# Altium PCB BUCK-BOOST_PWM_Controller.PcbDoc (part 2 of 2)
Units mm, origin at the board's own origin, x right, y up, seen from the top; angles counter-clockwise.
Board outline 90.1 x 70.25 mm, 2 copper layers (Top Layer, Bottom Layer); 191 components, 99 nets, 467 pads, 92 vias.
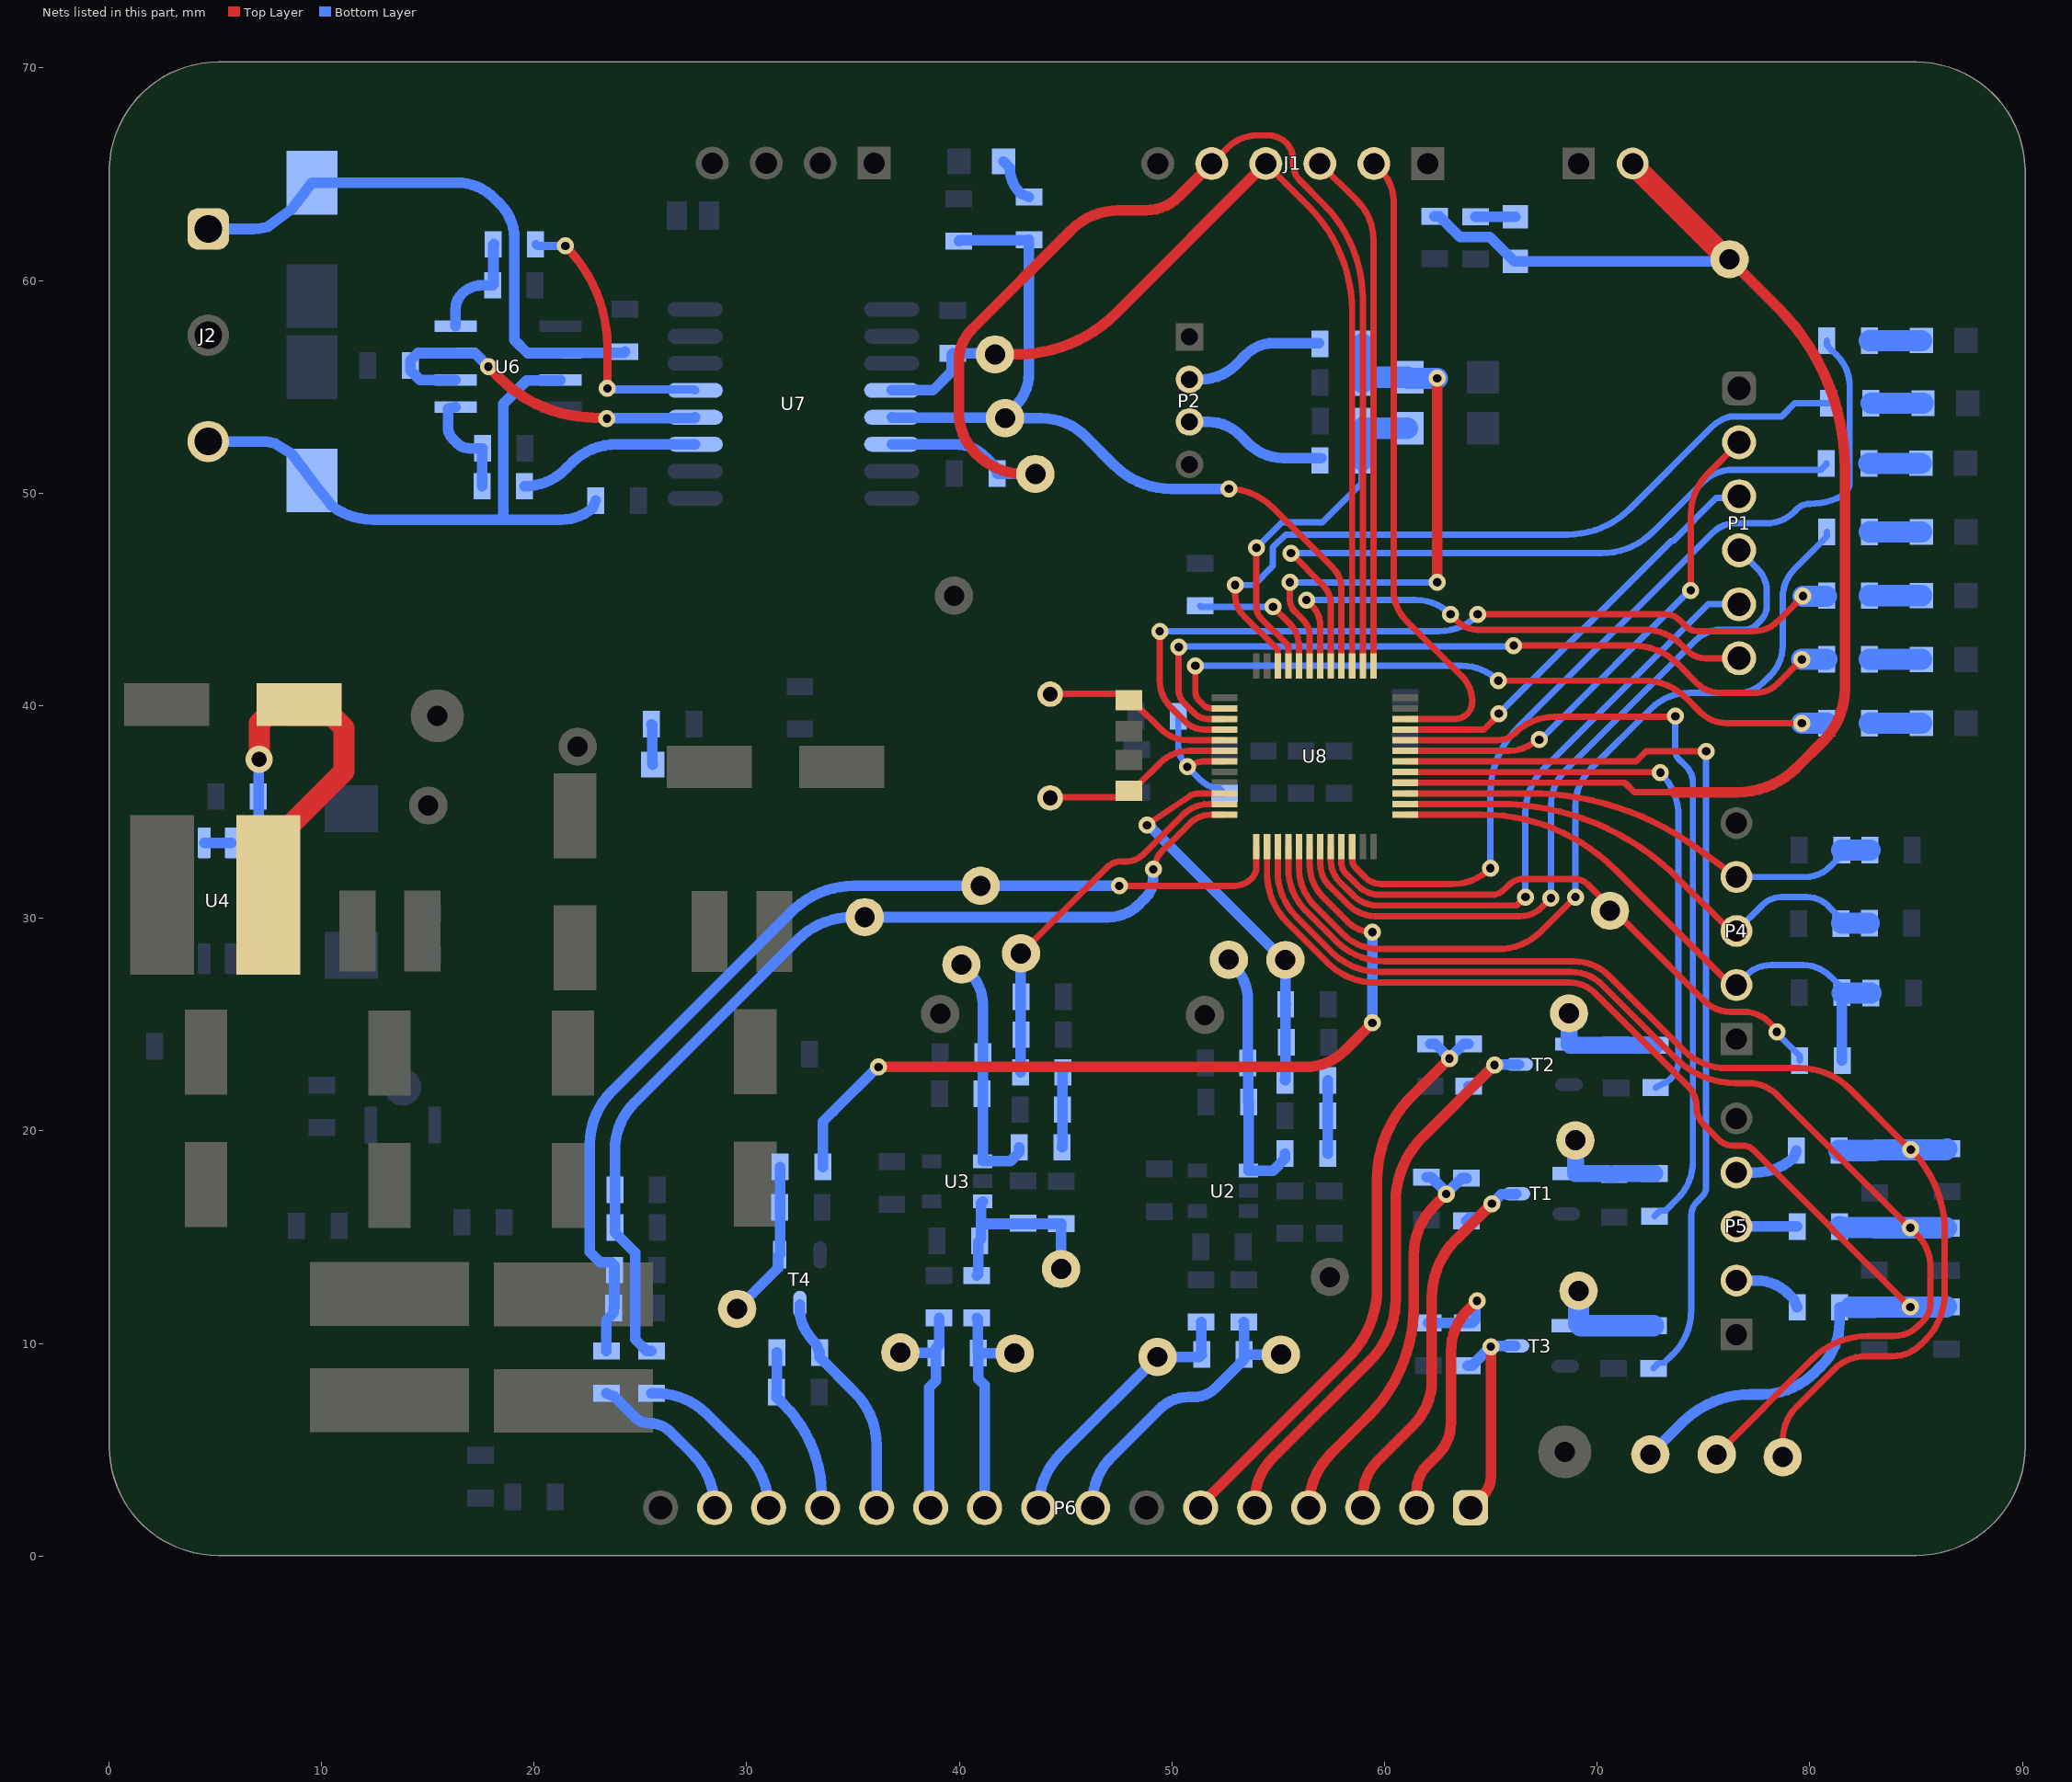
[diagram p2: the nets of this part, all layers, seen from the top]

## Via types
v1: diameter 0.8/0.8 (per signal layer), hole 0.4, Top Layer to Bottom Layer, tented both sides, 84 vias
v2: diameter 1.27, hole 0.711, Top Layer to Bottom Layer, 8 vias

## Nets (pads, with @x,y where several pads share a name; then routed paths per layer and width w, separated by ;. In a path a pad name is that pad's centre, name@x,y a point inside that pad or via, vN(x,y) a via of type N, cw(c..) or ccw(c..) an arc to the next point about the centre after c; other vN are vias at no path point) (continued)
NetC8_2: C8.2 C17.2 R4.2 R15.2 TP5.1 U3.3 | length 9.8
  Bottom Layer w0.5: R4.2@40.825,13.2 40.887,13.262 40.887,14.762 C8.2@40.95,14.825 41.025,14.9 41.025,15.587 ; U3.3@41.1,16.675 41.025,16.6 41.025,15.587 ; TP5.1@44.787,13.225 TP5.1@44.787,13.5 44.787,15.613 R15.2@44.8,15.625 41.063,15.625 41.025,15.587
NetC10_1: C10.1 P6.9 R9.1 TP10.1 | length 12.9
  Bottom Layer w0.5: P6.9@43.73,2.27 cw(c47.351,2.27) 44.792,4.832 TP10.1@49.322,9.362 51.288,9.362 C10.1@51.4,9.475 51.388,9.487 51.388,10.988 R9.1@51.375,11
NetC10_2: C10.2 P6.8 R3.1 TP2.1 | length 14.1
  Bottom Layer w0.5: P6.8@46.27,2.27 46.27,2.514 cw(c49.303,2.514) 47.16,4.66 49.411,6.911 cw(c50.77,5.556) 50.77,7.475 51.009,7.475 51.011,7.475 ccw(c51.011,8.957) 52.061,7.911 53.25,9.1 53.4,9.25 C10.2@53.4,9.475 TP2.1@55.125,9.475 ; R3.1@53.375,11 53.388,10.987 C10.2@53.388,9.475
NetC11_1: C11.1 P6.11 R10.1 TP12.1 | length 10.8
  Bottom Layer w0.5: TP12.1@37.225,9.575 37.238,9.562 38.887,9.562 C11.1@38.9,9.55 ; P6.11@38.65,2.27 38.575,2.345 38.575,7.925 38.9,8.25 C11.1@38.9,9.55 ; R10.1@39.05,11.2 39.05,9.925 38.9,9.775 C11.1@38.9,9.55
NetC11_2: C11.2 P6.10 R4.1 TP4.1 | length 10.8
  Bottom Layer w0.5: R4.1@40.825,11.2 40.862,11.163 40.862,9.587 C11.2@40.9,9.55 ; P6.10@41.19,2.27 41.19,8.035 40.9,8.325 C11.2@40.9,9.55 ; TP4.1@42.6,9.525 42.588,9.537 40.912,9.537 C11.2@40.9,9.55
NetC12_2: C12.2 R5.1 R6.2 | length 3.4
  Bottom Layer w0.5: R5.1@57.325,18.925 C12.2@57.325,20.7 R6.2@57.325,22.375
NetC13_2: C13.2 R6.1 R12.1 TP6.1 U8.10 | length 18.9
  Top Layer w0.3: v1(48.825,34.375) 48.902,34.452 50.876,35.772 ; 50.876,35.772 50.903,35.79 cw(c51.332,34.753) 51.333,35.875 ; 51.334,35.875 U8.10@52.475,35.875
  Bottom Layer w0.3: v1(48.825,34.375) v1@48.913,34.375 ; TP6.1@55.25,28.038 TP6.1@55.338,28.038
  Bottom Layer w0.5: v1@48.913,34.375 TP6.1@55.25,28.038 ; R6.1@55.325,22.375 55.338,22.387 55.338,25.937 C13.2@55.35,25.95 55.338,25.962 TP6.1@55.338,28.038
NetC14_2: C14.2 R7.1 R8.2 | length 3.5
  Bottom Layer w0.5: R7.1@44.825,19.225 44.85,19.25 C14.2@44.85,21 44.85,22.725 R8.2@44.875,22.75
NetC15_2: C15.2 R8.1 R13.1 TP8.1 U8.11 | length 17.9
  Top Layer w0.3: TP8.1@42.9,28.35 46.928,32.379 cw(c47.643,31.665) 47.643,32.675 ; 47.644,32.675 47.866,32.675 ; 47.867,32.675 ccw(c47.867,33.78) 48.649,32.999 50.505,34.855 cw(c51.76,33.601) 51.76,35.375 U8.11@52.475,35.375
  Bottom Layer w0.5: R8.1@42.875,22.75 42.887,22.762 42.887,28.337 TP8.1@42.9,28.35
NetC18_2: C18.2 R5.2 R16.2 TP7.1 U2.1 | length 12.4
  Bottom Layer w0.5: TP7.1@52.675,28.05 53.002,27.671 cw(c51.214,26.129) 53.575,26.129 R16.2@53.575,23.2 53.588,23.187 53.588,21.362 C18.2@53.6,21.35 U2.1@53.6,18.125 54.75,18.125 55.325,18.7 R5.2@55.325,18.925
NetC19_2: C19.2 R7.2 R17.2 TP9.1 U3.1 | length 11.7
  Bottom Layer w0.5: TP9.1@40.1,27.817 40.498,27.419 cw(c39.044,25.965) 41.1,25.965 R17.2@41.1,23.5 41.1,21.75 U3.1@41.1,18.575 42.4,18.575 42.825,19 R7.2@42.825,19.225
NetC24_1: C24.1 C26.2 L2.2 U4.8 | length 19.7
  Top Layer w1: v2@7.075,37.548 7.075,39.175 7.95,40.05 8.45,39.55 10.464,39.55 11.05,38.964 11.05,36.9 7.5,33.35 L2.2@7.5,31.1
  Bottom Layer w0.5: U4.8@7.03,33.55 7.053,33.572 7.053,37.453 v2(7.075,37.475)
NetC39_1: C39.1 U8.5 Y1.2 | length 9.2
  Top Layer w0.3: Y1.2@44.275,40.565 48.075,40.565 48.417,40.223 48.417,39.963 49.465,38.915 49.466,38.913 ccw(c50.765,40.212) 50.767,38.375 ; 50.768,38.375 U8.5@52.475,38.375
NetC40_1: C40.1 U8.6 Y1.1 | length 9.2
  Top Layer w0.3: Y1.1@44.275,35.685 48.075,35.685 48.075,35.946 48.456,36.327 48.458,36.327 49.434,37.303 cw(c50.814,35.924) 50.814,37.875 ; 50.815,37.875 U8.6@52.475,37.875
NetC41_2: C41.2 R35.1 U8.7 | length 6.5
  Top Layer w0.3: v1(50.726,37.126) 51.113,37.299 cw(c51.457,36.531) 51.457,37.373 52.028,37.373 U8.7@52.475,37.375
  Bottom Layer w0.3: 50.3,38.155 ccw(c51.755,38.155) 50.51,37.402 ccw(c50.766,37.559) 50.531,37.372 v1(50.726,37.126) 51.375,36.477 ccw(c52.225,37.327) 52.223,36.125 R35.1@52.475,35.875 ; 50.3,38.156 C41.2@50.3,39.5
NetC42_2: C42.2 R60.2 R63.2 TP37.1 U8.13 | length 49.2
  Top Layer w0.3: v1(47.525,31.525) 52.918,31.525 ; 52.919,31.525 ccw(c52.919,32.687) 53.739,31.864 53.741,31.866 ccw(c53.176,32.431) 53.975,32.431 U8.13@53.975,33.375
  Bottom Layer w0.5: R60.2@23.4,9.649 23.4,11.099 23.75,11.449 C42.2@23.75,11.674 ; C42.2@23.775,11.699 R63.2@23.775,13.674 ; R63.2@23.775,13.449 R63.2@23.775,13.674 ; v1(47.525,31.525) TP37.1@41,31.525 35.044,31.525 ccw(c35.044,27.374) 32.108,30.308 23.644,21.844 ccw(c26.099,19.386) 22.625,19.386 22.625,19.384 22.625,14.3 23.101,13.824 23.625,13.824 R63.2@23.775,13.674
NetC43_2: C43.2 R52.2 R64.2 TP33.1 U8.12 | length 45.9
  Top Layer w0.3: v1(49.125,32.3) 49.251,32.701 cw(c50.287,32.376) 49.519,33.144 50.216,33.841 50.823,34.448 cw(c51.848,33.424) 51.848,34.873 52.028,34.873 U8.12@52.475,34.875
  Bottom Layer w0.5: R52.2@25.525,9.649 25.3,9.649 24.75,10.199 24.75,14.274 23.8,15.224 C43.2@23.8,15.449 R64.2@23.8,17.224 23.8,19.089 23.8,19.09 cw(c26.962,19.09) 24.727,21.327 32.388,28.988 cw(c34.949,26.43) TP33.1@34.949,30.05 ; TP33.1@35.55,30.05 46.337,30.05 46.339,30.05 46.999,30.05 47.001,30.05 ccw(c47.001,32.1) 48.452,30.652 48.763,30.963 ccw(c47.92,31.805) 49.112,31.805 49.112,32.287 v1(49.125,32.3)
NetC44_2: C44.2 R62.2 R67.2 TP36.1 U8.16 | length 60.3
  Top Layer w0.3: U8.16@55.475,33.375 55.475,32.928 55.475,32.332 ccw(c58.275,32.335) 56.295,30.355 56.296,30.354 57.732,28.918 57.733,28.917 ccw(c60.007,31.191) 60.007,27.975 60.009,27.975 68.91,27.975 cw(c68.91,25.646) 70.558,27.292 74.053,23.797 74.054,23.796 ccw(c76.097,25.839) 76.097,22.95 76.098,22.95 79.533,22.95 cw(c79.533,19.618) 81.889,21.974 81.89,21.972 v1(84.75,19.112) cw(c80.888,15.25) 86.35,15.25 86.35,12.384 cw(c83.191,12.384) 85.424,10.149 85.219,9.944 cw(c83.907,11.255) 83.907,9.4 ; TP36.1@78.725,4.65 78.725,5.428 cw(c81.017,5.426) 79.397,7.047 81.099,8.749 cw(c82.67,7.179) 82.67,9.4 83.906,9.4
  Bottom Layer w1: R62.2@81.375,19.075 C44.2@83.05,19.075 83.088,19.112 v1(84.75,19.112) 86.413,19.112 R67.2@86.45,19.15
NetC45_2: C45.2 R58.2 R65.2 TP35.1 U8.15 | length 59.9
  Top Layer w0.3: 54.975,32.182 ccw(c57.95,32.182) 55.844,30.081 55.848,30.077 57.514,28.411 57.515,28.41 ccw(c59.772,30.666) 59.772,27.475 59.773,27.475 68.775,27.475 cw(c68.775,25.423) 70.227,26.873 73.683,23.417 ccw(c76.499,26.23) 76.499,22.25 76.5,22.25 77.089,22.25 77.091,22.25 cw(c77.09,20.265) 78.494,21.669 78.496,21.667 v1(84.725,15.437) 85.048,15.115 cw(c83.534,13.601) 85.675,13.601 85.675,11.868 cw(c84.545,11.868) 85.343,11.068 85.088,10.813 cw(c83.971,11.928) 83.971,10.35 ; 54.975,32.183 U8.15@54.975,33.375 ; TP35.1@75.625,4.775 80.107,9.257 cw(c82.744,6.622) 82.744,10.35 83.97,10.35
  Bottom Layer w1: R58.2@81.4,15.5 81.45,15.45 C45.2@83.025,15.45 83.038,15.437 v1(84.725,15.437) 86.413,15.437 R65.2@86.425,15.425
NetC46_2: C46.2 R53.2 R66.2 TP31.1 U8.14 | length 58.3
  Top Layer w0.3: 54.475,32.116 ccw(c57.772,32.116) 55.437,29.788 55.442,29.783 57.322,27.903 57.323,27.902 ccw(c59.561,30.141) 59.561,26.975 59.563,26.975 68.717,26.975 cw(c68.717,25.325) 69.885,26.49 74.262,22.113 cw(c73.268,21.117) 74.675,21.119 ccw(c75.863,21.117) 75.021,20.279 75.024,20.276 75.718,19.582 ccw(c76.397,20.26) 76.397,19.3 76.399,19.3 76.857,19.3 76.859,19.3 cw(c76.859,18.626) 77.335,19.103 77.336,19.101 v1(84.725,11.712) ; 54.475,32.117 U8.14@54.475,33.375
  Bottom Layer w0.5: TP31.1@72.5,4.775 73.99,6.265 cw(c77.211,3.048) 77.211,7.6 77.735,7.6 77.737,7.6 ccw(c77.737,11.132) 80.236,8.636 80.558,8.958 ccw(c78.53,10.989) 81.4,10.989 81.4,11.325 R53.2@81.4,11.7 ; R53.2@81.425,11.7 81.924,11.7
  Bottom Layer w1: 81.924,11.7 C46.2@83.025,11.7 83.038,11.712 v1(84.725,11.712) 86.413,11.712 R66.2@86.425,11.725
NetC47_2: C47.2 P4.4 R55.1 U8.27 | length 23.7
  Top Layer w0.3: U8.27@60.975,35.875 66.797,35.875 66.8,35.875 cw(c66.798,22.497) 74.693,33.297 P4.4@76.55,31.94 P4.4@76.265,31.95
  Bottom Layer w0.3: P4.4@76.55,31.94 79.796,31.94 ; 79.797,31.94 ccw(c79.797,33.552) 80.937,32.412 81.5,32.975 C47.2@81.5,33.2
  Bottom Layer w1: C47.2@81.5,33.2 R55.1@82.825,33.2
NetC48_2: C48.2 P4.3 R56.1 U8.26 | length 24.7
  Top Layer w0.3: U8.26@60.975,35.375 65.345,35.375 cw(c65.345,23.413) 73.805,31.87 P4.3@76.275,29.4
  Bottom Layer w0.3: P4.3@76.55,29.4 77.765,30.615 cw(c78.693,29.689) 78.693,31 79.842,31 cw(c79.842,29.537) 80.876,30.572 81.225,30.223 81.475,29.973 C48.2@81.475,29.748 C48.2@81.502,29.775
  Bottom Layer w1: C48.2@81.502,29.775 R56.1@82.8,29.775
NetC49_2: C49.2 P4.2 R57.1 R59.1 U8.25 | length 28.7
  Top Layer w0.3: U8.25@60.975,34.875 64.601,34.875 64.604,34.875 cw(c64.603,26.046) 70.846,32.289 70.847,32.288 P4.2@76.275,26.86
  Bottom Layer w0.3: P4.2@76.55,26.86 77.003,27.313 cw(c78.179,26.138) 78.179,27.8 ; 78.18,27.8 79.676,27.8 cw(c79.676,25.991) 80.953,27.272 81.25,26.975 81.5,26.725 C49.2@81.5,26.5 81.512,26.488 C49.2@81.525,26.475 ; R59.1@81.512,23.313 R59.1@81.525,23.3
  Bottom Layer w0.5: R59.1@81.512,23.313 C49.2@81.512,26.488
  Bottom Layer w1: C49.2@81.525,26.475 R57.1@82.875,26.475
NetD1_1: D1.1 R1.1 | length 1.9
  Bottom Layer w0.5: R1.1@25.525,39.125 25.55,39.1 25.55,37.25 D1.1@25.575,37.225
NetD2_1: D2.1 R30.1 | length 2.2
  Bottom Layer w0.5: D2.1@42.075,65.6 42.375,65.297 ccw(c44.065,65.3) 42.87,64.105 42.9,64.075 R30.1@43.275,63.925
NetD3_1: D3.1 R40.1 | length 2.5
  Bottom Layer w1: R40.1@82.8,48.175 D3.1@85.25,48.175
NetD4_1: D4.1 R41.1 | length 2.5
  Bottom Layer w1: R41.1@82.775,51.4 D4.1@85.225,51.4
NetD5_1: D5.1 R37.1 | length 2.5
  Bottom Layer w1: R37.1@82.8,39.175 D5.1@85.25,39.175
NetD6_1: D6.1 R38.1 | length 2.5
  Bottom Layer w1: R38.1@82.8,42.175 D6.1@85.25,42.175
NetD7_1: D7.1 R39.1 | length 2.5
  Bottom Layer w1: R39.1@82.8,45.175 D7.1@85.25,45.175
NetD8_1: D8.1 R42.1 | length 2.5
  Bottom Layer w1: R42.1@82.875,54.225 D8.1@85.325,54.225
NetD9_1: D9.1 R43.1 | length 2.5
  Bottom Layer w1: R43.1@82.8,57.175 D9.1@85.25,57.175
NetD10_1: D10.1 R61.1 | length 1.9
  Bottom Layer w0.5: R61.1@64.275,63 D10.1@66.15,63
NetD10_2: D10.2 P3.2 R54.2 TP34.1 U8.28 | length 66.7
  Top Layer w0.3: U8.28@60.975,36.375 71.3,36.375 71.75,35.925 73.575,35.925 73.6,35.95 73.625,35.925
  Top Layer w0.5: 73.625,35.925 76.568,35.925 ccw(c76.568,39.926) 79.397,37.097 80.619,38.319 ccw(c78.132,40.807) 81.65,40.807 81.65,51.123 ccw(c70.906,51.125) 78.5,58.725 TP34.1@76.225,61
  Top Layer w1: P3.2@71.67,65.462 TP34.1@76.022,61.11
  Bottom Layer w0.3: TP34.1@75.82,61 TP34.1@76.225,61
  Bottom Layer w0.5: R54.2@62.35,63.025 62.575,63.025 63.55,62.05 64.95,62.05 66.1,60.9 D10.2@66.15,60.9 69.125,60.9 ; 69.13,60.905 69.125,60.9 ; TP34.1@76.05,60.9 69.125,60.9
  Bottom Layer w1: P3.2@71.67,65.365 P3.2@71.67,65.5
NetJ1_2: J1.2 U8.34 | length 30.6
  Top Layer w0.3: J1.2@59.495,65.5 59.837,65.158 cw(c58.416,63.738) 60.425,63.738 60.425,45.441 60.425,45.439 ccw(c62.45,45.439) 61.019,44.006 63.618,41.407 63.619,41.406 cw(c62.409,40.189) 64.125,40.188 cw(c63.306,40.189) 63.885,39.61 cw(c63.319,40.174) 63.319,39.375 ; U8.34@60.975,39.375 63.318,39.375
NetJ1_3: J1.3 U8.37 | length 24.6
  Top Layer w0.3: J1.3@56.955,65.5 58.738,63.717 58.74,63.715 cw(c56.965,61.94) 59.475,61.941 59.475,61.939 U8.37@59.475,41.875
NetJ1_4: J1.4 R24.1 TP22.1 U7.4 U8.39 | length 47.5
  Top Layer w0.3: J1.4@54.415,65.5 56.411,63.504 56.413,63.502 cw(c51.433,58.523) 58.475,58.523 U8.39@58.475,41.875
  Top Layer w0.5: TP22.1@41.675,56.525 42.692,56.525 ccw(c42.688,63.17) 47.388,58.473 J1.4@54.415,65.5
  Bottom Layer w0.5: U7.4@36.825,54.835 38.76,54.835 39.643,55.718 39.643,56.518 R24.1@39.7,56.575 TP22.1@41.925,56.575
NetJ1_5: J1.5 R21.1 TP24.1 U7.6 U8.38 | length 60.7
  Top Layer w0.3: J1.5@51.875,65.5 52.628,66.253 cw(c54.01,64.87) 54.01,66.825 54.522,66.825 cw(c54.522,65.611) 55.382,66.468 cw(c54.646,65.734) 55.685,65.735 55.685,65.733 55.685,65.529 55.685,65.528 ccw(c56.862,65.528) 56.03,64.695 56.031,64.694 57.102,63.623 57.103,63.622 cw(c52.585,59.103) 58.975,59.103 U8.38@58.975,41.875
  Top Layer w0.5: TP24.1@43.569,50.934 TP24.1@43.575,50.9 43.102,50.894 cw(c43.061,54.088) 40.799,51.832 cw(c42.798,53.825) 39.975,53.83 39.975,56.205 39.975,56.207 cw(c42.102,56.207) 40.6,57.713 45.262,62.375 cw(c47.492,60.148) 47.492,63.3 48.759,63.3 48.761,63.3 ccw(c48.761,65.506) 50.323,63.948 J1.5@51.875,65.5
  Bottom Layer w0.5: U7.6@36.825,52.295 39.802,52.295 cw(c39.802,50.297) 41.215,51.71 41.625,51.3 R21.1@41.775,50.925 41.8,50.9 TP24.1@43.575,50.9
NetJ2_1: J2.1 R20.1 U6.6 ZD1.2 | length 27
  Bottom Layer w0.5: J2.1@4.675,62.425 6.783,62.425 6.784,62.425 ccw(c6.784,64.756) 7.477,62.53 8.6,63.353 ZD1.2@9.55,64.603 16.373,64.603 cw(c16.373,62.13) 18.121,63.879 18.123,63.877 18.4,63.6 18.402,63.598 cw(c16.777,61.973) 19.075,61.973 19.075,57.2 19.69,56.585 U6.6@21.24,56.585 21.255,56.6 24.225,56.6 R20.1@24.275,56.65
NetJ2_3: J2.3 R32.2 U6.7 ZD2.2 | length 28.8
  Bottom Layer w0.5: J2.3@4.675,52.426 7.21,52.425 7.213,52.425 cw(c7.212,50.462) 7.818,52.329 8.6,51.847 ZD2.2@9.55,50.597 10.5,49.39 ccw(c12.407,51.913) 12.407,48.75 12.409,48.75 18.375,48.75 ; U6.7@21.24,55.315 21.225,55.3 19.65,55.3 18.55,54.2 18.55,48.925 18.375,48.75 ; R32.2@22.9,49.65 22.75,49.275 22.575,49.155 cw(c21.27,51.055) 21.27,48.75 21.268,48.75 18.375,48.75
NetP1_2: P1.2 U8.31 | length 24.2
  Top Layer w0.3: U8.31@60.975,37.875 65.871,37.875 ; 65.872,37.875 ccw(c65.872,39.667) 66.751,38.105 v1(67.275,38.4) ; v1(74.4,45.425) 74.4,48.931 ; 74.4,48.932 cw(c77.256,48.932) 75.237,50.952 P1.2@76.675,52.39
  Bottom Layer w0.3: v1(67.275,38.4) 67.325,38.4 74.35,45.425 v1(74.4,45.425)
NetP1_3: P1.3 U8.33 | length 20.3
  Top Layer w0.3: U8.33@60.975,38.875 63.899,38.875 ; 63.901,38.875 64.675,38.875 65.375,39.575 v1(65.375,39.625)
  Bottom Layer w0.3: v1(65.375,39.625) 73.5,47.75 73.575,47.75 75.601,49.776 76.601,49.776 P1.3@76.675,49.85
NetP1_4: P1.4 U8.19 | length 35.2
  Top Layer w0.3: U8.19@56.975,33.375 56.975,32.928 56.975,32.55 ccw(c58.428,32.552) 57.401,31.524 57.402,31.523 58.304,30.621 58.306,30.619 ccw(c59.56,31.874) 59.56,30.1 59.561,30.1 66.406,30.1 ; 66.407,30.1 ccw(c66.407,31.472) 67.377,30.502 v1(67.825,30.95)
  Bottom Layer w0.3: v1(67.825,30.95) 67.825,35.286 67.825,35.288 cw(c70.206,35.289) 68.523,36.973 74.612,43.062 cw(c75.849,41.826) 75.849,43.575 76.943,43.575 ; P1.4@76.675,47.31 77.538,46.447 cw(c76.483,45.392) 77.975,45.392 77.975,44.687 cw(c77.04,44.687) 77.701,44.026 77.467,43.792 cw(c76.944,44.314) 76.944,43.575
NetP1_5: P1.5 U8.20 | length 29.7
  Top Layer w0.3: U8.20@57.475,33.375 57.475,32.928 57.475,32.692 ccw(c58.847,32.693) 57.877,31.723 57.878,31.722 58.518,31.082 58.52,31.079 ccw(c59.678,32.236) 59.68,30.6 66.199,30.6 66.599,31 v1(66.625,31)
  Bottom Layer w0.3: v1(66.625,31) 66.625,34.933 66.625,34.935 cw(c69.616,34.936) 67.502,37.052 75.22,44.77 P1.5@76.675,44.77
NetP1_6: P1.6 U8.42 | length 24.5
  Top Layer w0.3: v1(56.324,44.971) 56.581,44.714 cw(c55.63,43.763) 56.975,43.763 U8.42@56.975,41.875 ; v1(63.1,44.3) 63.445,43.955 ccw(c64.362,44.872) 64.362,43.575 ; 64.363,43.575 72.23,43.575 cw(c72.23,41.113) 73.971,42.854 73.972,42.853 74.244,42.581 74.245,42.58 ccw(c75.09,43.424) 75.09,42.23 ; 75.091,42.23 P1.6@76.675,42.23
  Bottom Layer w0.3: v1(56.324,44.971) 56.329,44.975 61.47,44.975 cw(c61.47,42.67) v1(63.1,44.3)
NetP2_2: P2.2 R47.2 | length 6.6
  Bottom Layer w0.5: P2.2@50.825,55.35 51.357,55.35 ccw(c51.355,57.692) 53.012,56.037 53.501,56.526 cw(c54.764,55.266) 54.764,57.05 R47.2@56.924,57.05
NetP2_3: P2.3 R48.2 | length 6.7
  Bottom Layer w0.5: P2.3@50.825,53.35 51.705,53.35 cw(c51.705,51.25) 53.189,52.736 53.192,52.733 53.594,52.331 53.596,52.329 ccw(c55.235,53.967) 55.235,51.65 55.236,51.65 R48.2@57.032,51.65
NetP5_2: P5.2 R53.1 | length 3.4
  Bottom Layer w0.5: P5.2@76.55,12.96 77.481,12.96 cw(c77.481,10.826) 78.99,12.335 79.25,12.075 R53.1@79.4,11.7
NetP5_3: P5.3 R58.1 | length 2.9
  Bottom Layer w0.5: P5.3@76.55,15.5 R58.1@79.4,15.5
NetP5_4: P5.4 R62.1 | length 3.2
  Bottom Layer w0.5: P5.4@76.55,18.04 77.422,18.04 ccw(c77.42,20.805) 79.225,18.711 R62.1@79.375,19.075
NetP6_1: P6.1 R46.1 T3.3 | length 10.6
  Top Layer w0.5: P6.1@64.05,2.27 64.631,2.851 ccw(c63.741,3.741) 65,3.741 v1(65,9.846)
  Bottom Layer w0.5: R46.1@63.9,8.958 64.125,8.958 64.275,9.108 64.275,9.125 64.9,9.75 64.904,9.75 v1(65,9.846) ; v1@64.996,9.846 65.033,9.883 T3.3@66.15,9.883
NetP6_2: P6.2 R36.1 R46.2 | length 13.8
  Top Layer w0.5: P6.2@61.51,2.27 61.51,3.074 cw(c63.194,3.072) 62.005,4.265 62.493,4.753 ccw(c60.972,6.277) 63.125,6.277 63.125,9.643 63.125,9.645 cw(c65.854,9.645) 63.924,11.574 v1(64.35,12)
  Bottom Layer w0.5: R36.1@62.05,10.958 R46.2@63.9,10.958 64.125,10.958 64.275,11.108 64.275,11.844 64.35,11.919 v1(64.35,12)
NetP6_3: P6.3 R11.1 T1.3 | length 19.3
  Top Layer w0.5: P6.3@58.97,2.27 58.97,2.786 cw(c61.35,2.784) 59.668,4.468 61.341,6.141 ccw(c59.213,8.273) 62.225,8.273 62.225,12.147 62.225,12.149 cw(c66.09,12.149) 63.359,14.884 v1(65.046,16.571)
  Bottom Layer w0.5: R11.1@63.85,15.766 64,15.916 64.391,15.916 v1(65.046,16.571) 65.494,17.019 66.178,17.019 T1.3@66.2,17.041
NetP6_4: P6.4 R2.1 R11.2 | length 19.4
  Top Layer w0.5: P6.4@56.43,2.27 cw(c60.051,2.27) 57.492,4.832 59.222,6.562 ccw(c54.028,11.758) 61.375,11.758 61.375,14.178 61.375,14.18 cw(c64.562,14.18) 62.308,16.433 v1(62.9,17.025)
  Bottom Layer w0.5: R2.1@61.975,17.816 62.2,17.816 62.843,17.173 62.843,17.082 v1(62.9,17.025) 62.9,17.041 63.625,17.766 R11.2@63.85,17.766
NetP6_5: P6.5 R28.1 T2.3 | length 27.8
  Top Layer w0.5: P6.5@53.89,2.27 53.89,2.564 cw(c56.806,2.562) 54.746,4.626 59.333,9.213 ccw(c56.461,12.088) 60.525,12.088 60.525,16.643 60.525,16.645 cw(c64.883,16.645) 61.803,19.728 v1(65.171,23.096)
  Bottom Layer w0.5: R28.1@63.95,22.1 64.175,22.1 v1(65.171,23.096) 65.2,23.125 T2.3@66.325,23.125
NetP6_6: P6.6 R25.1 R28.2 | length 27.9
  Top Layer w0.5: P6.6@51.35,2.27 51.35,2.4 58.282,9.332 ccw(c54.981,12.634) 59.65,12.634 59.65,12.635 59.65,17.685 59.65,17.687 cw(c65.234,17.687) 61.287,21.637 v1(63.05,23.4)
  Bottom Layer w0.5: R25.1@62.15,24.1 62.375,24.1 v1@63.05,23.425 ; v1(63.05,23.4) v1@63.05,23.425 ; R28.2@63.95,24.1 63.725,24.1 v1@63.05,23.425
NetP6_12: P6.12 R69.1 T4.3 | length 10.8
  Bottom Layer w0.5: T4.3@32.5,11.825 32.5,11.566 ccw(c34.359,11.57) 32.909,10.407 33.275,9.95 R69.1@33.425,9.575 33.425,9.35 35.077,7.698 35.079,7.696 cw(c32.591,5.208) 36.11,5.208 36.11,5.206 P6.12@36.11,2.27
NetP6_13: P6.13 R68.1 R69.2 | length 7.7
  Bottom Layer w0.5: R68.1@31.4,7.475 31.55,7.325 31.743,7.132 cw(c27.43,2.818) 33.527,3.006 P6.13@33.57,2.27 ; R68.1@31.4,7.7 31.413,7.712 31.413,9.563 R69.2@31.425,9.575
NetP6_14: P6.14 R52.1 | length 8.3
  Bottom Layer w0.5: R52.1@25.525,7.649 25.9,7.647 cw(c25.779,4.336) 28.122,6.678 ; 28.123,6.677 29.967,4.833 29.971,4.829 cw(c27.409,2.27) P6.14@31.03,2.27
NetP6_15: P6.15 R60.1 | length 7.9
  Bottom Layer w0.5: R60.1@23.4,7.649 R60.1@23.775,7.499 ; R60.1@23.776,7.499 24.769,6.506 ccw(c25.387,7.124) 25.384,6.25 25.387,6.25 cw(c25.386,4.744) 26.451,5.809 26.452,5.808 27.427,4.833 27.431,4.829 cw(c24.869,2.27) P6.15@28.49,2.27
NetR18_1: R18.1 U8.32 | length 37.6
  Top Layer w0.3: U8.32@60.975,38.375 65.33,38.375 ; 65.332,38.375 ccw(c65.332,39.511) 66.136,38.708 cw(c67.986,36.857) 67.986,39.475 73.65,39.475 v1(73.675,39.5)
  Bottom Layer w0.3: R18.1@72.7,15.991 72.95,16.241 73.216,16.241 73.779,16.804 ccw(c72.042,18.543) 74.5,18.543 74.5,36.388 ccw(c73.446,36.388) 74.19,37.135 73.829,37.496 cw(c74.208,37.871) 73.675,37.87 v1(73.675,39.5)
NetR18_2: R18.2 R19.2 T1.1 TP17.1 | length 5.3
  Bottom Layer w0.8: TP17.1@68.975,19.55 68.975,17.991 70.525,17.991 70.575,17.941 R19.2@70.75,17.941 ; R19.2@70.8,17.991 R18.2@72.7,17.991
NetR22_1: R22.1 R26.1 U6.4 | length 5.1
  Bottom Layer w0.5: U6.4@16.31,57.855 16.31,57.87 16.31,58.663 cw(c17.331,58.662) 16.607,59.382 cw(c17.553,58.44) 17.553,59.775 R22.1@18.05,59.775 18.088,59.813 18.088,61.688 R26.1@18.125,61.725
NetR23_1: R23.1 R27.1 U6.1 | length 5.2
  Bottom Layer w0.5: U6.1@16.31,54.045 15.95,53.98 15.95,53.116 ccw(c16.774,53.116) 16.19,52.535 ccw(c16.774,53.116) 16.191,52.534 16.379,52.346 ccw(c16.973,52.939) 16.972,52.1 17.375,52.1 R23.1@17.575,52.1 17.562,52.087 17.562,50.337 R27.1@17.55,50.325
NetR26_2: R26.2 U7.13 | length 12.8
  Top Layer w0.4: v1(21.475,61.625) 21.479,61.621 cw(c16.707,56.857) 23.45,56.857 v1(23.45,54.925)
  Bottom Layer w0.4: R26.2@20.075,61.7 20.15,61.625 v1(21.475,61.625) ; v1(23.45,54.925) 23.495,54.88 27.53,54.88 U7.13@27.575,54.835
NetR27_2: R27.2 U7.11 | length 8.6
  Bottom Layer w0.5: R27.2@19.55,50.325 19.75,50.332 ccw(c19.55,53.04) 21.471,51.121 21.765,51.415 cw(c23.889,49.292) 23.889,52.295 U7.11@27.575,52.295
NetR29_2: R29.2 U6.2 U6.3 U7.12 | length 17.3
  Top Layer w0.5: v1(17.85,55.95) 18.388,55.412 ccw(c22.887,59.917) 22.464,53.564 v1(23.425,53.5)
  Bottom Layer w0.5: U6.2@16.31,55.315 14.635,55.315 14.175,55.775 R29.2@14.175,56 14.175,56.225 14.535,56.585 U6.3@16.31,56.585 16.325,56.57 17.23,56.57 v1(17.85,55.95) ; v1(23.425,53.5) 23.457,53.532 27.543,53.532 U7.12@27.575,53.565
NetR30_2: R30.2 R31.2 TP21.1 U7.5 U8.40 | length 40.1
  Top Layer w0.3: v1(52.675,50.2) 52.68,50.2 cw(c52.63,47.256) 54.713,49.337 54.717,49.333 57.569,46.481 57.57,46.48 cw(c56.593,45.503) 57.975,45.503 U8.40@57.975,41.875
  Bottom Layer w0.5: U7.5@36.825,53.565 36.845,53.545 42.13,53.545 TP21.1@42.15,53.525 ; R31.2@39.975,61.85 40.012,61.887 43.237,61.887 R30.2@43.275,61.925 43.275,55.644 43.275,55.642 cw(c41.082,55.642) 42.633,54.091 42.15,53.609 TP21.1@42.15,53.525 ; v1(52.675,50.2) 49.959,50.2 49.957,50.2 cw(c49.957,53.959) 47.299,51.301 47.297,51.303 45.933,52.667 45.93,52.67 ccw(c43.864,50.6) 43.865,53.525 43.861,53.525 TP21.1@42.15,53.525
NetR33_1: R33.1 U8.29 | length 27.6
  Top Layer w0.3: U8.29@60.975,36.875 60.977,36.873 72.952,36.873 v1(72.975,36.85)
  Bottom Layer w0.3: R33.1@72.75,22.033 73.225,22.283 73.283,22.283 73.485,22.485 ccw(c72.664,23.306) 73.825,23.306 73.825,34.798 ccw(c70.923,34.798) v1(72.975,36.85)
NetR33_2: R33.2 R34.2 T2.1 TP26.1 | length 5.5
  Bottom Layer w0.8: TP26.1@68.675,25.525 T2.1@68.675,24.075 68.717,24.033 70.9,24.033 R33.2@72.75,24.033
NetR37_2: R37.2 U8.2 | length 33.5
  Top Layer w0.3: v1(51.1,41.875) 51.1,40.666 ccw(c51.723,40.666) 51.282,40.227 51.471,40.037 ccw(c51.863,40.43) 51.862,39.875 52.028,39.875 U8.2@52.475,39.875 ; v1(65.35,41.175) 72.204,41.175 cw(c72.204,38.347) 74.205,40.345 74.866,39.684 ccw(c76.093,40.909) 76.093,39.175 ; 76.094,39.175 v1(79.625,39.175)
  Bottom Layer w0.3: v1(51.1,41.875) 63.646,41.875 cw(c63.646,39.485) 65.182,41.316 v1(65.35,41.175) v1@65.336,41.175
  Bottom Layer w1: v1(79.625,39.175) R37.2@80.8,39.175
NetR38_2: R38.2 U8.3 | length 36.7
  Top Layer w0.3: v1(50.325,42.75) 50.306,42.731 50.306,40.769 ccw(c51.205,40.767) 50.568,40.132 50.569,40.131 51.068,39.632 51.069,39.631 ccw(c51.681,40.243) 51.681,39.377 52.028,39.377 U8.3@52.475,39.375 ; v1(66.075,42.825) 71.697,42.825 71.7,42.825 cw(c71.699,39.865) 73.792,41.958 73.793,41.957 74.711,41.039 74.713,41.037 ccw(c75.744,42.068) 75.744,40.61 ; 75.745,40.61 77.49,40.61 ; 77.491,40.61 ccw(c77.491,41.983) 78.463,41.013 v1(79.625,42.175)
  Bottom Layer w0.3: v1(50.325,42.75) 50.362,42.787 66.038,42.787 v1(66.075,42.825)
  Bottom Layer w1: v1(79.625,42.175) R38.2@80.8,42.175
NetR39_2: R39.2 U8.4 | length 39.1
  Top Layer w0.3: v1(49.425,43.5) 49.425,41.199 49.425,41.197 ccw(c51.23,41.197) 49.955,39.92 50.64,39.235 50.641,39.234 ccw(c51.508,40.101) 51.506,38.875 52.028,38.875 U8.4@52.475,38.875 ; v1(64.375,44.3) 73.198,44.3 cw(c73.198,43.33) 73.884,44.016 73.885,44.015 74.147,43.753 74.148,43.752 ccw(c74.756,44.36) 74.756,43.5 ; 74.757,43.5 77.345,43.5 ; 77.346,43.5 ccw(c77.346,45.138) 78.505,43.98 v1(79.675,45.15)
  Bottom Layer w0.3: v1(49.425,43.5) 62.564,43.5 ; 62.566,43.5 ccw(c62.566,46.059) 64.293,44.171 ccw(c64.089,44.391) v1(64.375,44.3) ; R39.2@80.775,45.15 R39.2@80.8,45.175
  Bottom Layer w1: v1(79.675,45.15) R39.2@80.775,45.15
NetR40_2: R40.2 U8.17 | length 40.9
  Top Layer w0.3: U8.17@55.975,33.375 55.975,32.928 55.975,32.372 ccw(c58.508,32.374) 56.717,30.583 56.718,30.582 58.045,29.255 58.046,29.254 ccw(c59.745,30.952) 59.745,28.55 59.747,28.55 65.333,28.55 ; 65.334,28.55 ccw(c65.334,31.425) 67.368,29.393 v1(68.975,31)
  Bottom Layer w0.3: v1(68.975,31) 68.975,35.274 68.975,35.276 cw(c71.448,35.276) 69.7,37.025 72.541,39.866 cw(c74.312,38.097) 74.312,40.6 ; 74.313,40.6 76.62,40.6 ; 76.621,40.6 ccw(c76.621,42.299) 77.823,41.098 78.156,41.431 ccw(c76.785,42.804) 78.725,42.804 78.725,45.076 ; 78.725,45.078 cw(c80.651,45.078) 79.29,46.44 80.8,47.95 R40.2@80.8,48.175
NetR41_2: R41.2 U8.41 | length 32.7
  Top Layer w0.3: v1(55.6,47.175) 57.083,45.692 57.085,45.69 cw(c56.143,44.748) 57.475,44.748 U8.41@57.475,41.875
  Bottom Layer w0.3: v1(55.6,47.175) 70.206,47.175 ; 70.208,47.175 ccw(c70.208,50.597) 72.628,48.178 74.942,50.492 cw(c76.41,49.025) 76.41,51.1 80.525,51.1 80.775,51.35 R41.2@80.775,51.4
NetR42_2: R42.2 U8.46 | length 36.3
  Top Layer w0.3: v1(52.975,45.675) 52.975,45.196 ccw(c54.357,45.197) 53.38,44.22 53.381,44.219 54.973,42.627 54.973,41.877 U8.46@54.975,41.875
  Bottom Layer w0.3: v1(52.975,45.675) 53.85,45.675 54.75,46.575 54.75,47.45 55.35,48.05 68.611,48.05 ; 68.612,48.05 ccw(c68.612,52.186) 71.537,49.262 75.363,53.088 cw(c76.756,51.698) 76.252,53.6 78.675,53.6 79.3,54.225 R42.2@80.875,54.225
NetR43_2: R43.2 U8.22 | length 42.1
  Top Layer w0.3: U8.22@58.475,33.375 58.477,32.928 58.477,32.76 ccw(c59.025,32.761) 58.638,32.374 59.102,31.909 59.103,31.908 ccw(c59.834,32.639) 59.834,31.606 ; 59.835,31.606 63.177,31.606 ; 63.178,31.606 ccw(c63.178,34.147) v1(64.975,32.35)
  Bottom Layer w0.3: v1(64.975,32.35) 64.975,35.831 cw(c69.416,35.835) 66.273,38.973 75.448,48.148 ; 75.449,48.149 cw(c76.491,47.106) 76.491,48.58 77.957,48.58 ; 77.959,48.58 ccw(c77.959,50.443) 79.276,49.126 cw(c80.013,48.574) 80.011,49.495 80.015,49.495 ccw(c80.017,52.717) 81.249,49.74 ccw(c80.748,50.95) 81.675,50.025 ccw(c81.193,50.507) 81.875,50.507 81.875,55.035 ; R43.2@80.8,57.175 80.8,56.95 81.05,56.7 81.282,56.468 cw(c79.849,55.036) 81.875,55.036
NetR44_1: R44.1 R47.1 U8.43 VD1.2 | length 26.2
  Top Layer w0.3: v1(55.55,45.8) 55.55,44.97 ccw(c56.324,44.971) 55.778,44.422 56.19,44.01 56.191,44.009 cw(c55.505,43.323) 56.475,43.323 U8.43@56.475,41.875
  Top Layer w0.5: v1(62.475,45.8) v1(62.475,55.4)
  Bottom Layer w0.3: v1(55.55,45.8) v1(62.475,45.8)
  Bottom Layer w1: R44.1@58.953,55.209 R44.1@58.953,55.3 ; R47.1@58.953,57.009 R44.1@58.953,55.3 ; v1(62.475,55.4) 61.122,55.4 VD1.2@61.072,55.45 59.103,55.45 R44.1@58.953,55.3
NetR45_1: R45.1 R48.1 U8.45 VD2.2 | length 17.3
  Top Layer w0.3: 53.975,44.596 ccw(c54.629,44.596) 54.168,44.132 55.475,42.825 U8.45@55.475,41.875 ; 53.975,44.597 v1(53.975,47.425)
  Bottom Layer w0.3: v1(53.975,47.425) 55.175,48.625 56.31,48.625 ; 56.311,48.625 57.075,48.625 58.911,50.461 58.911,51.492 R48.1@58.953,51.534
  Bottom Layer w0.5: R48.1@58.953,51.534 R48.1@58.966,51.547 ; R45.1@58.978,53.384 58.978,53.2 R45.1@59.128,53.05
  Bottom Layer w1: R48.1@58.966,51.547 R45.1@58.966,53.05 ; R45.1@59.128,53.05 VD2.2@61.072,53.05
NetR49_1: R49.1 U8.30 | length 44.3
  Top Layer w0.3: U8.30@60.975,37.375 71.825,37.375 72.301,37.851 v1(75.125,37.851)
  Bottom Layer w0.3: R49.1@72.65,8.833 72.9,9.083 73.158,9.083 73.571,9.496 ccw(c71.509,11.558) 74.425,11.558 74.425,16.013 ; 74.425,16.015 cw(c75.355,16.015) 74.698,16.673 74.941,16.916 ccw(c74.496,17.36) 75.125,17.36 v1(75.125,37.851)
NetR49_2: R49.2 R50.2 T3.1 TP29.1 | length 5.1
  Bottom Layer w0.5: T3.1@69.125,10.933 69.225,10.833
  Bottom Layer w1: T3.1@69.125,10.933 TP29.1@69.125,12.475 ; 69.225,10.833 R50.2@70.775,10.833 R49.2@72.65,10.833
NetR51_2: R51.2 U8.44 | length 6.7
  Top Layer w0.3: v1(54.75,44.65) 55.533,43.867 55.535,43.865 cw(c54.472,42.803) 55.975,42.803 55.975,42.322 U8.44@55.975,41.875
  Bottom Layer w0.3: R51.2@51.325,44.7 51.375,44.65 v1(54.75,44.65)
NetR59_2: R59.2 TP32.1 U8.21 | length 26.8
  Top Layer w0.3: U8.21@57.975,33.375 57.975,32.928 57.975,32.518 ccw(c58.754,32.635) 58.199,32.076 58.737,31.538 ccw(c59.793,32.592) 59.795,31.1 65.022,31.1 ; 65.023,31.1 ccw(c65.023,31.954) 65.627,31.351 65.836,31.559 cw(c66.537,30.859) 66.537,31.85 68.913,31.85 cw(c68.913,30.915) 69.574,31.576 69.575,31.575 70.7,30.45 71.775,29.375 75.051,26.099 75.053,26.097 ccw(c76.254,27.299) 76.254,25.6 ; 76.255,25.6 76.88,25.6 cw(c76.88,23.862) 78.109,25.091 78.45,24.75 v1(78.45,24.65)
  Bottom Layer w0.3: v1(78.45,24.65) 78.45,24.6 79.525,23.525 R59.2@79.525,23.3
NetR70_1: R70.1 U8.18 | length 39.5
  Top Layer w0.3: U8.18@56.475,33.375 56.475,32.928 56.475,32.541 ccw(c58.692,32.543) 57.125,30.975 58.271,29.829 ccw(c59.425,30.98) v1(59.425,29.35)
  Top Layer w0.5: v1(36.2,23) 56.258,23 56.26,23 ccw(c56.261,25.628) 58.122,23.772 v1(59.425,25.075)
  Bottom Layer w0.5: R70.1@33.575,18.3 33.575,19.722 33.575,19.723 33.575,20.425 34.071,20.921 36.15,23 v1(36.2,23) ; v1(59.425,25.075) v1(59.425,29.35)
NetR70_2: R70.2 R71.2 T4.1 TP38.1 | length 7.5
  Bottom Layer w0.5: TP38.1@29.55,11.625 31.492,13.567 31.492,14.117 31.562,14.187 31.562,16.4 31.562,18.288 R70.2@31.575,18.3
NetU4_6: U4.6 U4.7 | length 1.3
  Bottom Layer w0.5: U4.6@4.49,33.55 U4.7@5.76,33.55
pads on no net: U4.3 U4.5 U7.3 U7.14

## Polygon pours and split planes (outlines as drawn)
GND_III on Top Layer "NONET_L-01_P-001" (solid, pour order 2): 0,0 0.125,0.125 0.125,44.45 27.525,44.45 33.475,50.4 33.475,70.275 90.15,70.275 90.15,0
GND_2 on Top Layer "NONET_L-01_P-001" (solid, pour order 1): 0.038,47.757 0.163,47.632 27.282,47.632 30.8,51.15 30.8,70.057 2.013,70.057 0.038,68.082
GND_III on Bottom Layer "NONET_L-01_P-001" (solid, pour order 3): 0,0 0.125,0.125 0.125,44.45 27.525,44.45 33.475,50.4 33.475,70.275 90.15,70.275 90.15,0
GND_2 on Bottom Layer "NONET_L-01_P-001" (solid, pour order 8): 0.496,47.624 0.496,67.68 2.865,70.049 30.875,70.049 30.875,51.225 27.274,47.624
GND_2 on Bottom Layer "NONET_L-01_P-001" (solid, pour order 0): 0.05,47.75 0.175,47.625 23.275,47.625 23.275,47.7 29.9,54.325 29.9,70.05 2.025,70.05 0.05,68.075

## Keep-outs
Keep-Out Layer:
  circle w0.254: c85,5.15 r1.717
  circle w0.254: c5.15,5.15 r1.717
  lines w0.254: 0.15,65.15 cw(c5.15,65.15) 5.15,70.15 85,70.15 cw(c85,65.15) 90,65.15 ; 0.15,65.3 0.15,5.15 ccw(c5.15,5.15) 5.15,0.15 85,0.15 ccw(c85,5.15) 90,5.15 90,65.3

## Other copper
Top Layer:
  rectangle net GND_2: 29.925,63.775 30.85,67.425

## Silkscreen, mask and mechanical layers (free items; w line width, h text height)
Top Overlay:
  text "A" at 11.879,62.604 h1
  text "RX" at 52.221,60.504 h0.8 r90
  text "TX" at 54.921,60.504 h0.8 r90
  text "3.3" at 62.546,60.279 h0.8 r90
  text "DIO" at 60.121,60.254 h0.8 r90
  text "GND" at 49.421,60.229 h0.8 r90
  text "CLK" at 57.421,60.179 h0.8 r90
  text "INT" at 69.571,60.129 h0.8 r90
  text "GND" at 72.168,60.09 h0.8 r90
  text "5V" at 53.829,57.479 h0.8
  text "GND" at 10.804,57.179 h0.8
  text "SDA" at 53.729,55.204 h0.8
  text "GND" at 71.204,54.554 h0.8
  text "SCL" at 53.654,52.579 h0.8
  text "OUT_1" at 71.054,51.912 h0.8
  text "B" at 11.804,51.504 h1
  text "GND" at 53.641,50.022 h0.8
  text "OUT_2" at 71.107,49.295 h0.8
  text "OUT_3" at 71.207,46.92 h0.8
  text "OUT_4" at 71.179,44.462 h0.8
  text "OUT_5" at 71.079,41.962 h0.8
  text "GND" at 73.054,34.054 h0.8
  text "C" at 74.279,31.554 h0.8
  text "B" at 74.379,29.054 h0.8
  text "A" at 74.404,26.629 h0.8
  text "+5" at 73.529,23.954 h0.8
  text "GND" at 73.054,20.229 h0.8
  text "C1" at 74.104,17.754 h0.8
  text "B1" at 74.104,15.204 h0.8
  text "A1" at 74.154,12.729 h0.8
  text "+5" at 73.666,10.087 h0.8
  text "I2" at 28.921,4.479 h0.7 r90
  text "I1" at 31.296,4.354 h0.7 r90
  text "CAT_3" at 64.408,4.325 h0.7 r90
  text "+5" at 26.296,4.204 h0.7 r90
  text "AN_3" at 61.854,4.129 h0.7 r90
  text "O_N2" at 38.879,4.079 h0.7 r90
  text "AN_4" at 33.829,3.954 h0.7 r90
  text "GND" at 49.046,3.954 h0.7 r90
  text "AN_1" at 51.729,3.929 h0.7 r90
  text "AN_2" at 56.714,3.929 h0.7 r90
  text "CAT_1" at 54.254,3.904 h0.7 r90
  text "CAT_2" at 59.341,3.903 h0.7 r90
  text "CAT_4" at 36.483,3.85 h0.7 r90
  text "O_P1" at 46.654,3.829 h0.7 r90
  text "O_N1" at 44.029,3.779 h0.7 r90
  text "O_P2" at 41.529,3.729 h0.7 r90
Bottom Overlay:
  text "CAT_3" at 64.358,7.5 h0.7 r90
  text "CAT_2" at 59.408,7.425 h0.7 r90
  text "CAT_4" at 36.383,7.075 h0.7 r90
  text "CAT_1" at 54.083,7.025 h0.7 r90
  text "AN_3" at 61.908,6.825 h0.7 r90
  text "O_N2" at 38.908,6.7 h0.7 r90
  text "AN_2" at 56.733,6.7 h0.7 r90
  text "AN_4" at 33.808,6.375 h0.7 r90
  text "AN_1" at 51.633,6.225 h0.7 r90
  text "O_N1" at 44.008,6.2 h0.7 r90
  text "O_P2" at 41.508,6.15 h0.7 r90
  text "O_P1" at 46.658,6.125 h0.7 r90
  text "I2" at 28.891,5.51 h0.7 r90
  text "+5" at 26.275,5.45 h0.7 r90
  text "I1" at 31.275,5.175 h0.7 r90
  text "GND" at 49.046,4.029 h0.7 r90

## Text inside footprints (layer, text, board x,y; h text height)
P1: Top Overlay "1" at 78.55,54.425 h1.02